# Altium PCB MicroMMC_SM_v3.PcbDoc
Units mm, origin at the board's own origin, x right, y up, seen from the top; angles counter-clockwise.
Board outline 50 x 25 mm, 4 copper layers (Top Layer, GND1, GND2, Bottom Layer), stack 1.586 mm thick; 71 components, 41 nets, 213 pads, 184 vias.
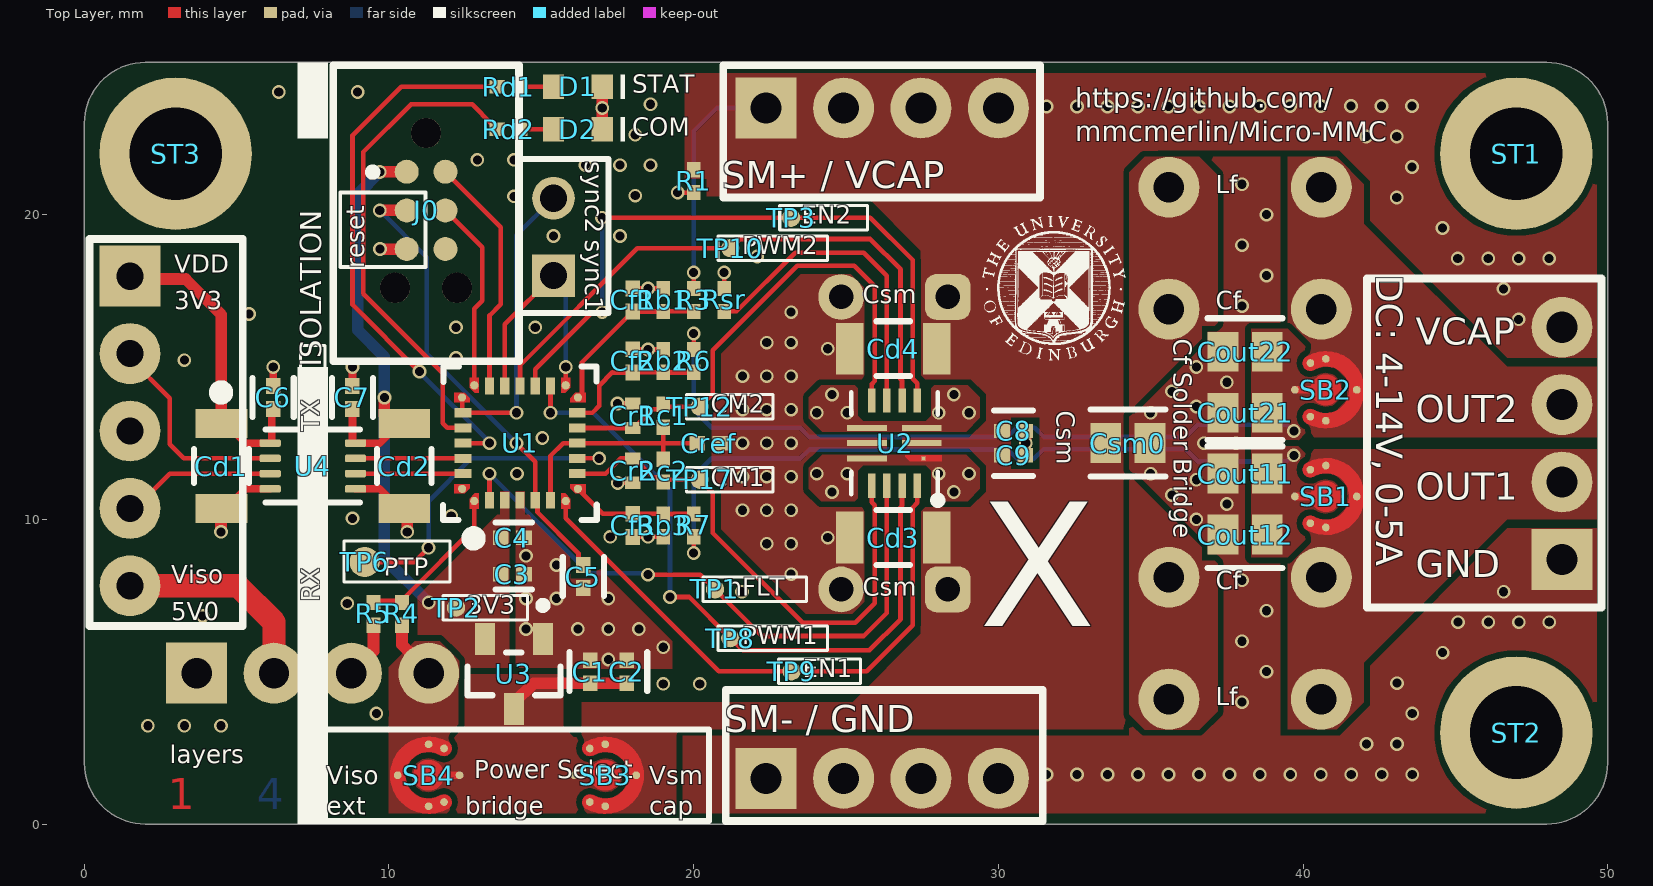
[diagram p0: Top Layer view]
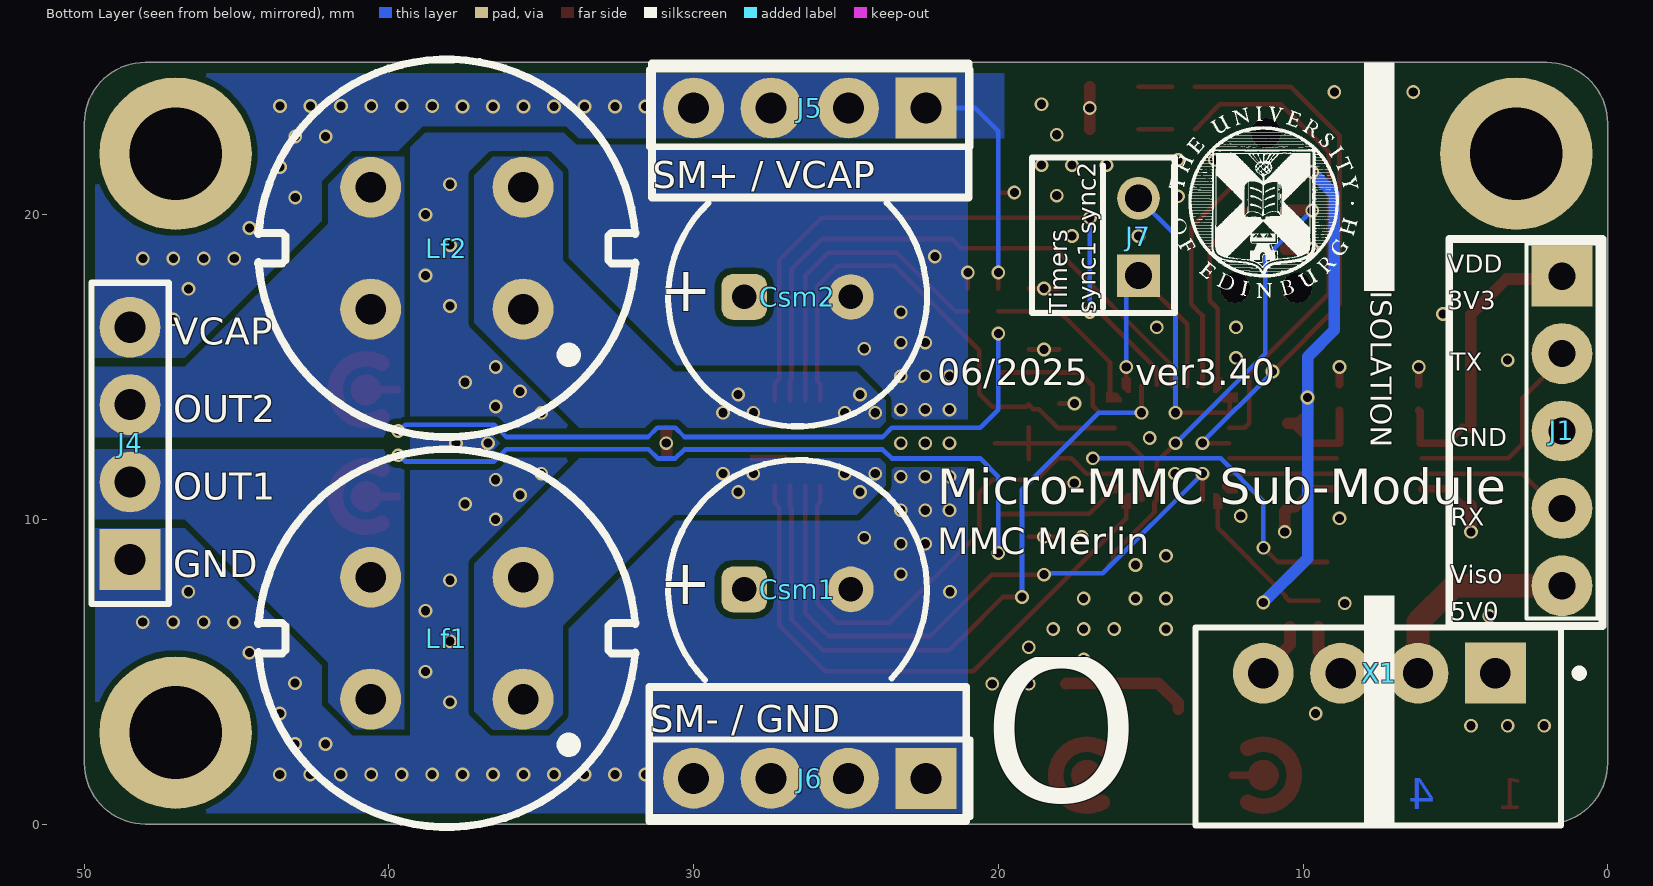
[diagram p1: Bottom Layer view, seen from below]
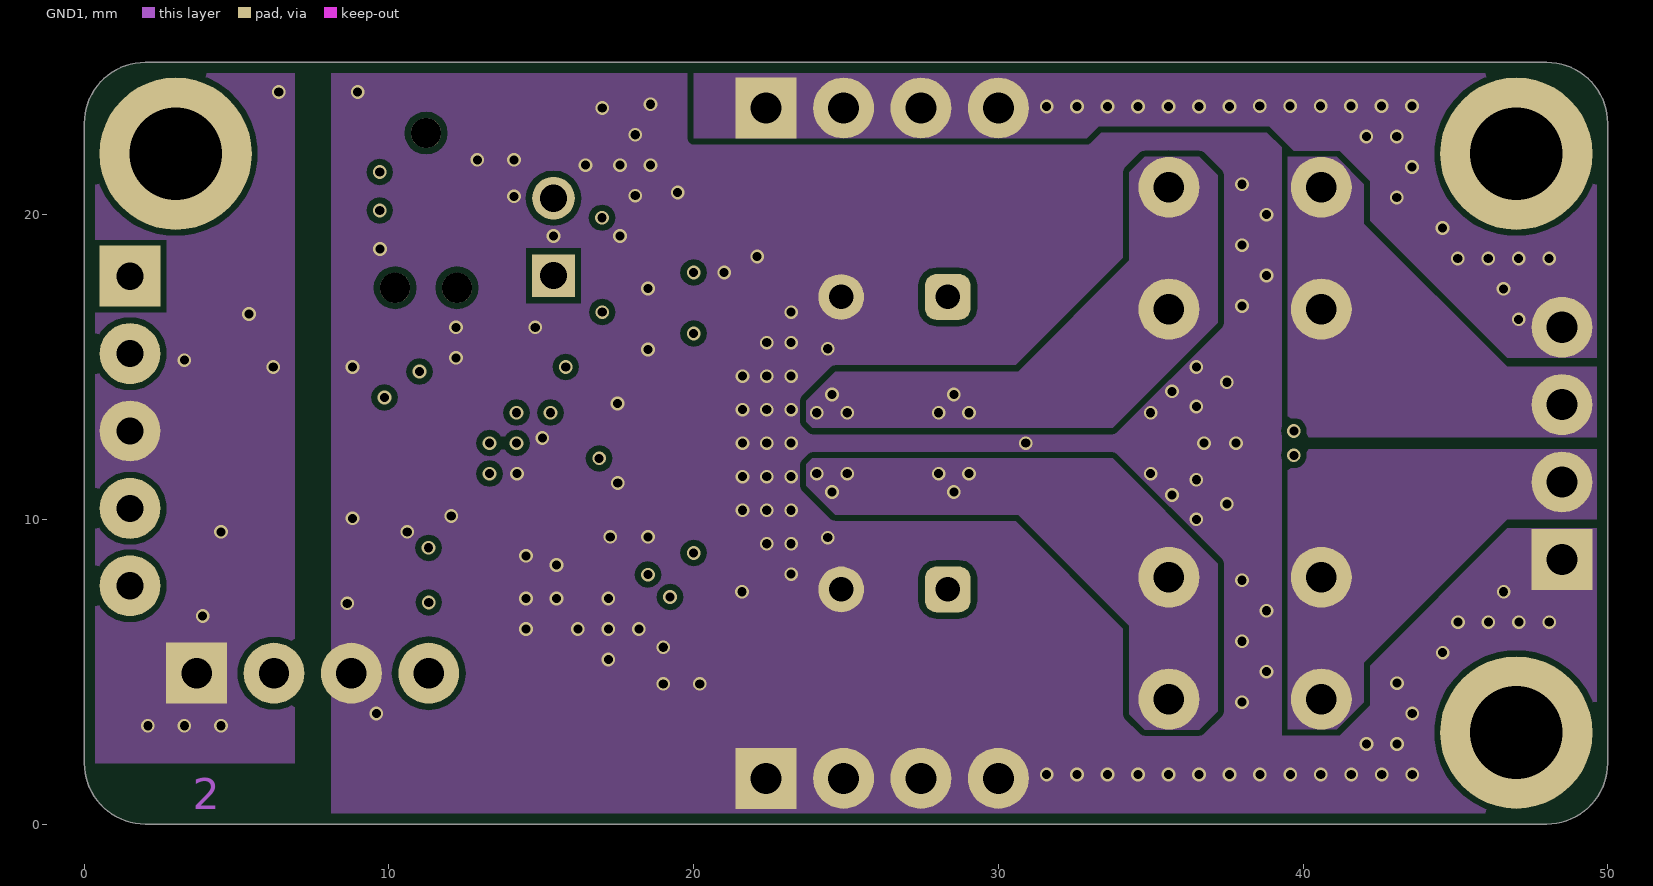
[diagram p2: GND1]
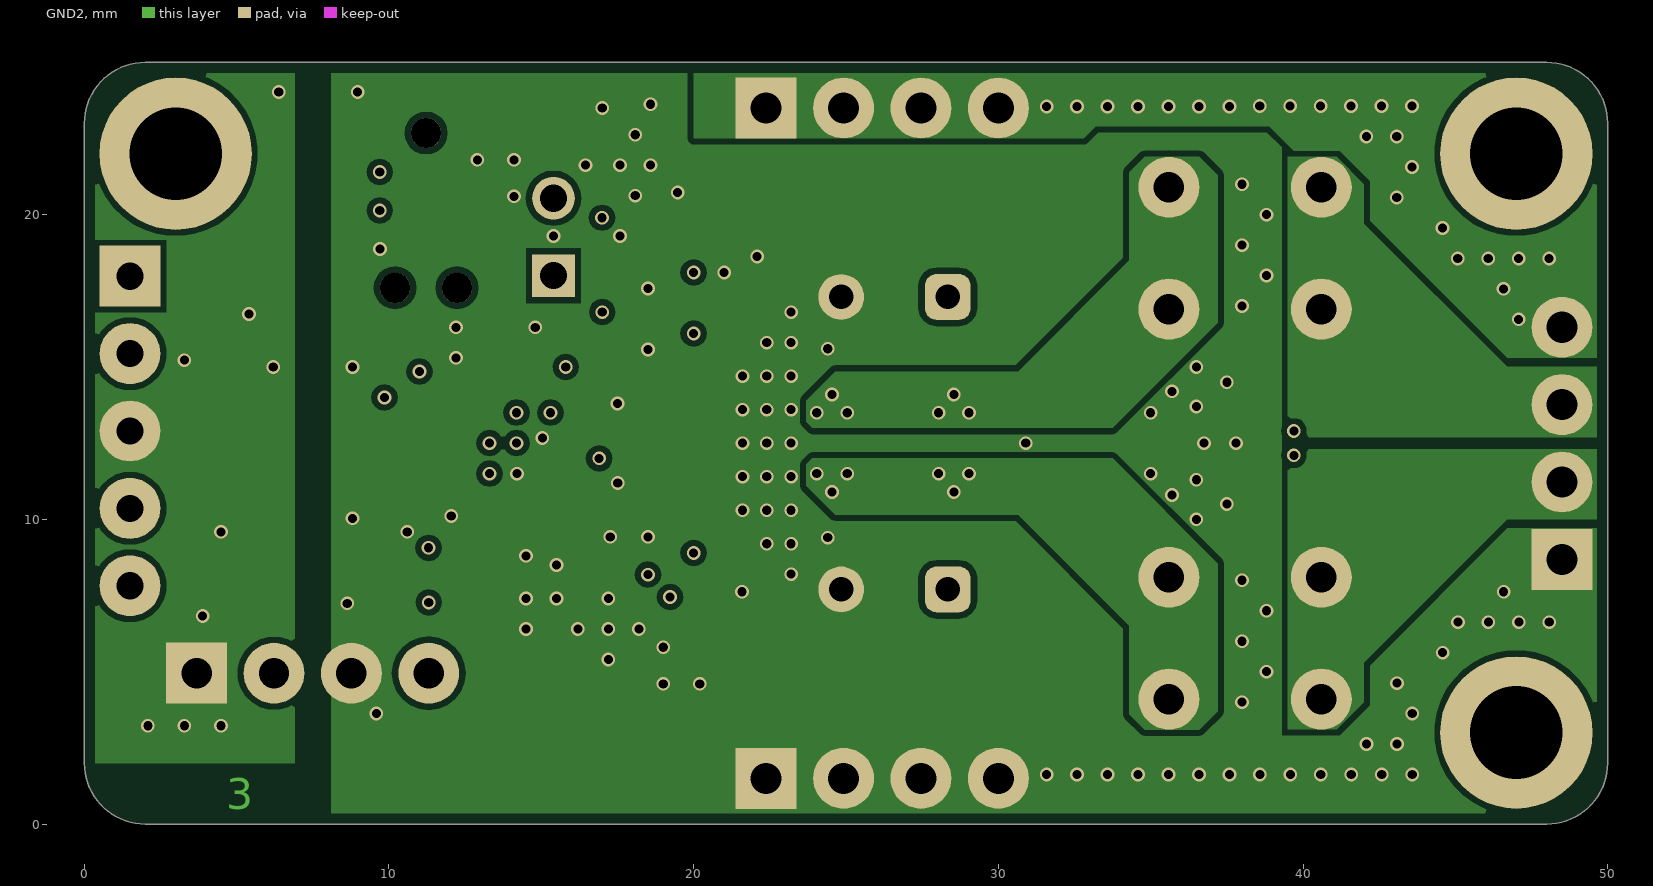
[diagram p3: GND2]
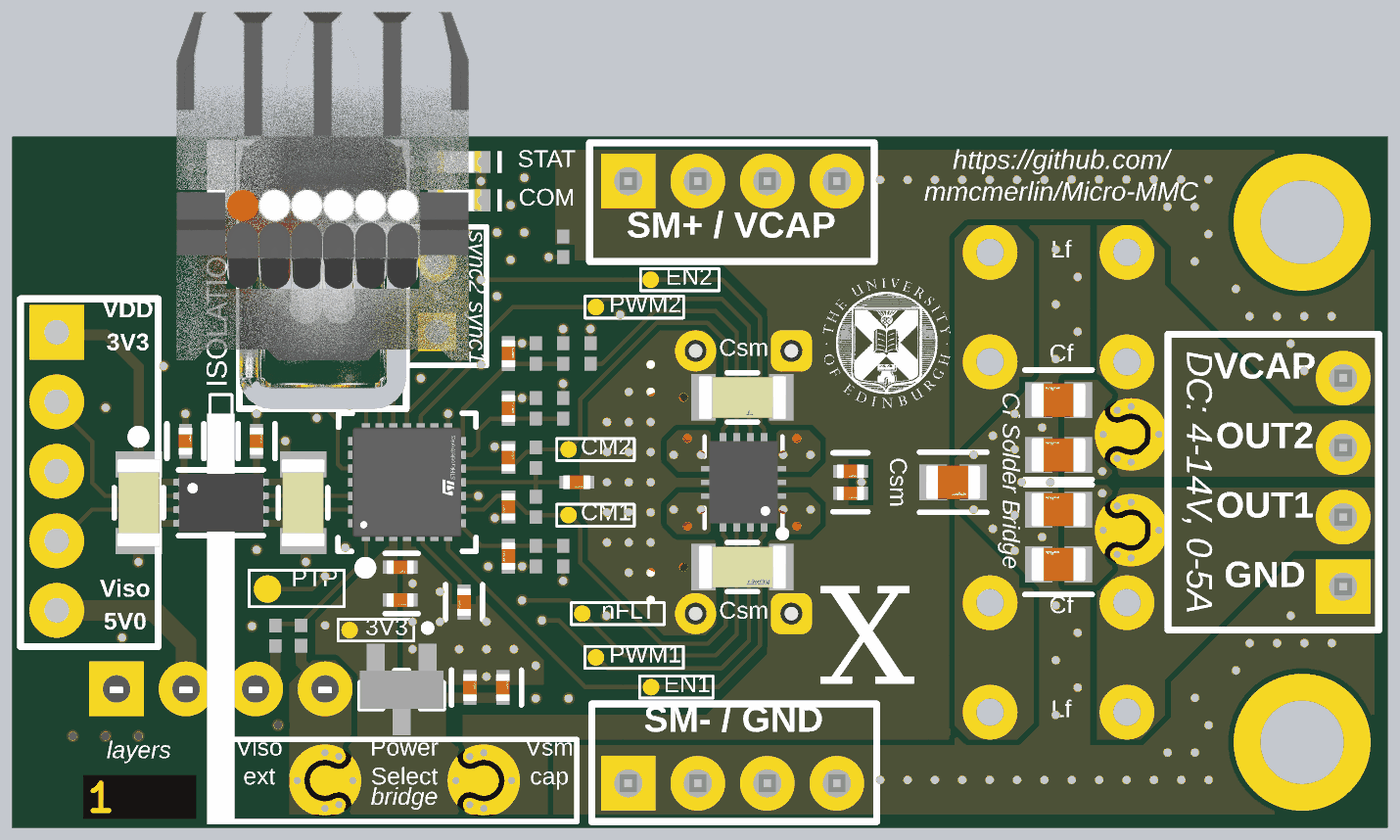
[diagram p4: 3D render of the assembled board from above, using the file's embedded part models]
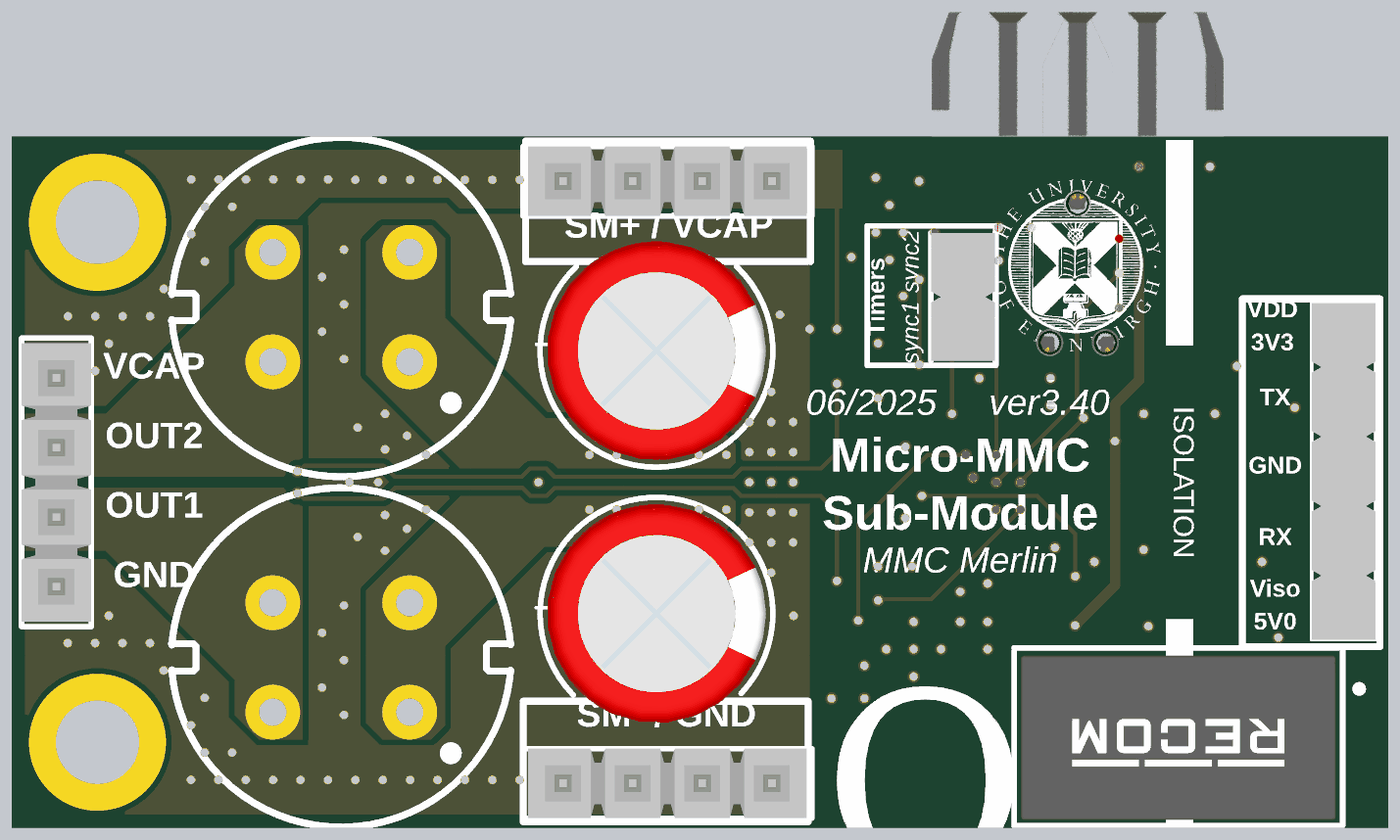
[diagram p5: 3D render of the assembled board from below, using the file's embedded part models]

## Layer stack, top to bottom
Top Solder: solder mask 0.0127, Solder Resist, Dk 3.8
Top Layer: signal copper 0.035
Dielectric 1: prepreg 0.2104, PP-022, Dk 4.6
GND1: signal copper 0.0152
Dielectric1: core 1.065, FR-4, Dk 4.6
GND2: signal copper 0.0152
Dielectric 2: prepreg 0.2104, PP-022, Dk 4.6
Bottom Layer: signal copper 0.035
Bottom Solder: solder mask 0.0127, Solder Resist, Dk 3.8

## Board outline
0,2 0,23 cw(c2,23) 2,25 48,25 cw(c48,23) 50,23 50,2 cw(c48,2) 48,0 2,0 cw(c2,2)

## Design rules (kind name [scope] priority, off if disabled: settings)
BoardOutlineClearance [All] p1: gap=0.35 ignorepadtopadclearanceinfootprint=FALSE
Clearance [All] p1: gap=0.2 ignorepadtopadclearanceinfootprint=FALSE except(0.254: Via-Via)
Height [All] p1: minheight=0 maxheight=100 prefheight=12.7
HoleSize [All] p1: absolutevalues=TRUE maxlimit=6 minlimit=0.25 maxpercent=80.000 minpercent=20.000
HoleToHoleClearance [All] p1: gap=0.45 allowstackedmicrovias=TRUE
MinimumSolderMaskSliver [All] p1: minsoldermaskwidth=0.1
PlaneConnect [All] p1: planeconnectstyle=Direct reliefexpansion=0.508 reliefentries=4 reliefconductorwidth=0.254 reliefairgap=0.254
PolygonConnect [All] p1: connectstyle=Direct reliefconductorwidth=0.254 reliefentries=4 polygonreliefangle="90 Angle" airgapwidth=0.254
RoutingVias [All] p1: holewidth=1 width=2 viastyle="Through Hole" minholewidth=0.3 minwidth=0.45 maxholewidth=6 maxwidth=12
SilkToSolderMaskClearance [IsPad] p1: minsilkscreentomaskgap=0.15 clearancetoexposedcopper=TRUE
SolderMaskExpansion [Not IsVia] p1: expansion=0.04 istentingtop=FALSE
SolderMaskExpansion SolderMaskExpansion_via [IsVia] p2: expansion=0.102 istentingtop=TRUE
SupplyNets "Schematic Supply Nets_5" [InNet('GND_SM')] p1: voltage=0.000
SupplyNets "Schematic Supply Nets_7" [InNet('Viso_SM')] p2: voltage=0.000
SupplyNets "Schematic Supply Nets_6" [InNet('+3.3V_SM')] p3: voltage=0.000
SupplyNets "Schematic Supply Nets_4" [InNet('Vdd_MA')] p4: voltage=0.000
SupplyNets "Schematic Supply Nets_3" [InNet('GND_MA')] p5: voltage=0.000
SupplyNets "Schematic Supply Nets_2" [InNet('V_REF')] p6: voltage=0.000
SupplyNets "Schematic Supply Nets_1" [InNet('Viso_MA')] p7: voltage=0.000
SupplyNets "Schematic Supply Nets" [InNet('VCAP_SM')] p8: voltage=0.000
UnRoutedNet [All] p1: checkbadconnections=TRUE
Width [All] p1: maxlimit=0.762 minlimit=0.152 preferedwidth=0.381
23 further rules are at their usual default settings.

## Components (designator, comment, footprint, x,y, rotation, side; value= is the part's Value field where it differs from the comment)
C1 "GRM155R61E105KA12D" FP-GRM155-0_05-IPC_C 16.6,5 r90 top
C2 "GRM155R61E105KA12D" FP-GRM155-0_05-IPC_C 17.8,5 r90 top
C3 "GRM155R61E105KA12D" FP-GRM155-0_05-IPC_C 14.05,8.2 r0 top
C4 "GRM155R61E105KA12D" FP-GRM155-0_05-IPC_C 14.05,9.4 r0 top
C5 "GRM155R61E105KA12D" FP-GRM155-0_05-IPC_C 16.379,8.121 r270 top
C6 "GRM155R61E105KA12D" FP-GRM155-0_05-IPC_C 6.2,14 r90 top
C7 "GRM155R61E105KA12D" FP-GRM155-0_05-IPC_C 8.8,14 r90 top
C8 "GRM155R61E105KA12D" FP-GRM155-0_05-IPC_C 30.5,12.9 r0 top
C9 "GRM155R61E105KA12D" FP-GRM155-0_05-IPC_C 30.5,12.1 r0 top
Cd1 "C1206C104M5RACTU" FP-C1206C-EB-MFG#1 4.5,11.75 r270 top value="0.10 μF"
Cd2 "C1206C104M5RACTU" FP-C1206C-EB-MFG#1 10.5,11.75 r270 top value="0.10 μF"
Cd3 "C1206C104M5RACTU" FP-C1206C-EB-MFG#2 26.55,9.4 r180 top value="0.10 μF"
Cd4 "C1206C104M5RACTU" FP-C1206C-EB-MFG#2 26.55,15.6 r180 top value="0.10 μF"
Cf1 "CL05B103KB5NNNC" FP-CL165-IPC_C 18,17.2 r90 top
Cf2 "CL05B103KB5NNNC" FP-CL165-IPC_C 18,15.2 r90 top
Cf3 "CL05B103KB5NNNC" FP-CL165-IPC_C 18,9.8 r270 top
Cout11 "GRM21BR61H475ME51L" FP-GRM21B-0_15-IPC_C 38.1,11.5 r180 top
Cout12 "GRM21BR61H475ME51L" FP-GRM21B-0_15-IPC_C 38.1,9.5 r180 top
Cout21 "GRM21BR61H475ME51L" FP-GRM21B-0_15-IPC_C 38.1,13.5 r180 top
Cout22 "GRM21BR61H475ME51L" FP-GRM21B-0_15-IPC_C 38.1,15.5 r180 top
Cr1 "GJM1555C1H100JB01D" FP-GJM155-0_05-MFG 18,13.4 r90 top
Cr2 "GJM1555C1H100JB01D" FP-GJM155-0_05-MFG 18,11.6 r270 top
Cref "GRM155R61E105KA12D" FP-GRM155-0_05-IPC_C 20.5,12.5 r0 top
Csm0 "GRM21BR61H475ME51L" FP-GRM21B-0_15-IPC_C 34.25,12.5 r0 top
Csm1 "860010474012" WCAP-ATG8_D8H11.5 26.59,7.7 r0 bottom value=470uF
Csm2 "860010474012" WCAP-ATG8_D8H11.5 26.59,17.3 r0 bottom value=470uF
D1 "150060RS75000" WL-SMCW_0603_150060xx75000 16.2,24.2 r180 top
D2 "150060RS75000" WL-SMCW_0603_150060xx75000 16.2,22.8 r180 top
J0 "TC2030-CTX-NL" FP-TC2030-CTX-NL-MFG 11.216,20.14 r270 top
J1 "5-146280-5" 5-146280-5 1.5,17.98 r270 bottom
J4 "TSW-104-08-L-S" SMTC-TSW-104-08-X-S 48.5,8.685 r90 bottom
J5 "TSW-104-08-L-S" SMTC-TSW-104-08-X-S 22.38,23.5 r0 bottom
J6 "TSW-104-08-L-S" SMTC-TSW-104-08-X-S 22.38,1.5 r0 bottom
J7 "5-146280-2" TECO-5-146280-2_V 15.4,19.27 r90 bottom
Lf1 "RCH1216BNP-100M" "TH Inductor" 35.6,8.1 r270 bottom
Lf2 "RCH1216BNP-100M" "TH Inductor" 35.6,20.9 r270 bottom
R1 "RC0402FR-0710KL" RESC1005X40X25LL05T10 20,21.1 r90 top
R3 "RC0402FR-0710KL" RESC1005X40X25LL05T10 20,17.2 r90 top
R4 "RC0402FR-0710KL" RESC1005X40X25LL05T10 10.426,6.897 r270 top
R5 "RC0402FR-0710KL" RESC1005X40X25LL05T10 9.491,6.896 r90 top
R6 "RC0402FR-0710KL" RESC1005X40X25LL05T10 20,15.2 r90 top
R7 "RC0402FR-0710KL" RESC1005X40X25LL05T10 20,9.8 r270 top
Rb1 "RC0402FR-073K3L" RESC1005X40X25LL05T10 19,17.2 r270 top
Rb2 "RC0402FR-073K3L" RESC1005X40X25LL05T10 19,15.2 r270 top
Rb3 "RC0402FR-073K3L" RESC1005X40X25LL05T10 19,9.8 r90 top
Rc1 "RC0402FR-073K3L" RESC1005X40X25LL05T10 19,13.4 r270 top
Rc2 "RC0402FR-073K3L" RESC1005X40X25LL05T10 19,11.6 r90 top
Rd1 "RC0402FR-073K3L" RESC1005X40X25LL05T10 13.925,24.2 r0 top
Rd2 "RC0402FR-073K3L" RESC1005X40X25LL05T10 13.925,22.8 r0 top
Rsr "RC0402FR-0710KL" RESC1005X40X25LL05T10 21,17.2 r270 top
SB1 "Solder-Bridge-NO" Solder-Bridge-NO-Footprint-1#1 40.75,10.75 r180 top
SB2 "Solder-Bridge-NO" Solder-Bridge-NO-Footprint-1#1 40.75,14.25 r180 top
SB3 "Solder-Bridge-NO" Solder-Bridge-NO-Footprint-1#2 17.1,1.6 r180 top
SB4 "Solder-Bridge-NO" Solder-Bridge-NO-Footprint-1#1 11.3,1.6 r0 top
ST1 "PTH-M3D0X5" PTH-M2D5X5#1 47,24.5 r0 top locked
ST2 "PTH-M3D0X5" PTH-M2D5X5#2 47,0.5 r0 top locked
ST3 "PTH-M3D0X5" PTH-M2D5X5#3 -7,24.5 r0 top locked
TP1 "TPAD6R" TP06R#1 20.7,7.7 r90 top
TP2 "TPAD6R" TP06R#1 12.2,7.1 r270 top
TP3 "TPAD6R" TP06R#1 23.2,19.9 r90 top
TP6 "TPAD6R" TP06R#2 9.2,8.6 r90 top locked
TP8 "TPAD6R" TP06R#1 21.2,6.1 r90 top
TP9 "TPAD6R" TP06R#1 23.214,5.014 r90 top
TP10 "TPAD6R" TP06R#1 21.2,18.9 r90 top
TP12 "TPAD6R" TP06R#1 20.2,13.7 r0 top
TP17 "TPAD6R" TP06R#1 20.2,11.3 r0 top
U1 "STM32G071GBU6" FP-UFQFPN28-A0B0-MFG 14.3,12.5 r90 top
U2 "MP6551GQB-P" QFN-14_MP6551_MNP 26.59,12.5 r180 top
U3 "MCP1799T-3302H/TT" FP-C04-104-MFG 14.1,4.925 r270 top
U4 "ISO6521REUR" SON50P300X105-8N 7.5,11.75 r0 top
X1 "RFM-0505S" FP-RFM-0505S-MFG 7.535,3.2 r0 bottom

## Footprints (in the part's own frame and the unit in brackets; to place one, negate y for a bottom-side part, rotate by r counter-clockwise, add the part's x,y. Pads: shape width x height; smd on the part's side, far side on the other; paste and mask are expansions set on the pad)
5-146280-5 [mm] "PCB Mount Header, Vertical, Board-to-Board, 5 Position, 2.54 mm [.1 in] Centerline, Breakaway, Gold (Au), Through Hole - Solder, AMPMODU Headers"
  rect 2x2 hole 0.89: 1(0,0)
  round 2 hole 0.89: 2(2.54,0) 3(5.08,0) 4(7.62,0) 5(10.16,0)
  silkscreen extent -1.07,-1.17 11.23,1.17, body extent -1.07,-1.17 11.23,1.17, height 8.19
FP-C04-104-MFG [mm]
  rect 1.05x0.65 smd paste+0 mask+0: 1(-1.15,0.95) 2(-1.15,-0.95) 3(1.15,0)
  silkscreen extent -2.37,-1.53 0.7,1.52, body extent -1.78,-1.88 1.78,1.87, height 0.25
FP-C1206C-EB-MFG#1 [mm]
  rect 0.95x1.7 smd paste+0 mask+0: 1(-1.4,0) 2(1.4,0)
  silkscreen extent -0.55,-0.9 0.55,0.9, body extent -2,-1 2,1, height 0.25
FP-C1206C-EB-MFG#2 [mm]
  rect 0.9x1.7 smd paste+0 mask+0: 1(-1.425,0) 2(1.425,0)
  silkscreen extent -0.55,-0.9 0.55,0.9, body extent -2,-1 2,1, height 0.25
FP-CL165-IPC_C [mm]
  rect 0.515x0.472 smd paste+0 mask+0: 1(-0.379,0) 2(0.379,0)
  body extent -0.74,-0.38 0.74,0.38, height 0.25
FP-GJM155-0_05-MFG [mm]
  rect 0.4x0.5 smd paste+0 mask+0: 1(-0.4,0) 2(0.4,0)
  body extent -0.7,-0.38 0.7,0.38, height 0.25
FP-GRM21B-0_15-IPC_C [mm]
  rect 1.006x1.308 smd paste+0 mask+0: 1(-0.726,0) 2(0.726,0)
  silkscreen extent -1.23,-1.1 1.23,-1.1, body extent -1.33,-0.8 1.33,0.8, height 0.25
FP-GRM155-0_05-IPC_C [mm]
  rect 0.515x0.472 smd paste+0 mask+0: 1(-0.379,0) 2(0.379,0)
  silkscreen extent -0.64,0.67 0.64,0.67, body extent -0.74,-0.38 0.74,0.38, height 0.25
FP-RFM-0505S-MFG [mm]
  rect 2x2 hole 1 paste-2539.97 mask+0: 1(-3.85,-1.75)
  round 2 hole 1 paste-2539.97 mask+0: 2(-1.31,-1.75) 3(1.23,-1.75) 4(3.77,-1.75)
  silkscreen extent -6.72,-3.25 6,3.25, body extent -5.75,-2.97 5.75,3.04, height 10.5
FP-TC2030-CTX-NL-MFG [mil]
  round 30.98 smd paste-39370.1 mask+0: 1(-50,-25) 2(-50,25) 3(0,-25) 4(0,25) 5(50,-25) 6(50,25)
  round 39.02 hole 39.02 unplated paste-99999 mask+0: ""(-100,0) ""(100,40) ""(100,-40)
  silkscreen extent -54,-74 -45,-64, body extent -199,-124 199,124, height 10
FP-UFQFPN28-A0B0-MFG [mm]
  round 0.27 smd paste+0 mask+0: 1(-1.9,1.5) 7(-1.9,-1.5) 8(-1.5,-1.9) 14(1.5,-1.9) 15(1.9,-1.5) 21(1.9,1.5) 22(1.5,1.9) 28(-1.5,1.9)
  rect 0.55x0.3 smd paste+0 mask+0: 2(-1.875,1) 3(-1.875,0.5) 4(-1.875,0) 5(-1.875,-0.5) 6(-1.875,-1) 16(1.875,-1) 17(1.875,-0.5) 18(1.875,0) 19(1.875,0.5) 20(1.875,1)
  rect 0.3x0.55 smd paste+0 mask+0: 9(-1,-1.875) 10(-0.5,-1.875) 11(0,-1.875) 12(0.5,-1.875) 13(1,-1.875) 23(1,1.875) 24(0.5,1.875) 25(0,1.875) 26(-0.5,1.875) 27(-1,1.875)
  Top Layer region: 1.65,1.35 1.65,1.48 1.82,1.65 2.15,1.65 2.15,1.35 1.65,1.35
  Top Layer region: -1.35,-1.65 -1.48,-1.65 -1.65,-1.82 -1.65,-2.15 -1.35,-2.15 -1.35,-1.65
  Top Layer region: -1.65,-1.35 -1.65,-1.48 -1.82,-1.65 -2.15,-1.65 -2.15,-1.35 -1.65,-1.35
  Top Layer region: 1.65,-1.35 1.65,-1.48 1.82,-1.65 2.15,-1.65 2.15,-1.35 1.65,-1.35
  Top Layer region: -1.65,1.35 -1.65,1.48 -1.82,1.65 -2.15,1.65 -2.15,1.35 -1.65,1.35
  Top Layer region: 1.35,-1.65 1.48,-1.65 1.65,-1.82 1.65,-2.15 1.35,-2.15 1.35,-1.65
  Top Layer region: 1.35,1.65 1.48,1.65 1.65,1.82 1.65,2.15 1.35,2.15 1.35,1.65
  Top Layer region: -1.35,1.65 -1.48,1.65 -1.65,1.82 -1.65,2.15 -1.35,2.15 -1.35,1.65
  silkscreen extent -3.32,-2.52 2.52,2.52, body extent -2.25,-2.25 2.25,2.25, height 0.25
PTH-M2D5X5#1 [mm]
  round 5 hole 3.05: 1(0,-2.5)
PTH-M2D5X5#2 [mm]
  round 5 hole 3.05: 1(0,2.5)
PTH-M2D5X5#3 [mm]
  round 5 hole 3.05: 1(10,-2.5)
QFN-14_MP6551_MNP [mm]
  rect 0.127x0.127 smd mask+0: 1(-0.95,0.5)
  rect 1.3x0.2 smd paste+0 mask+0: 2(-0.9,0) 3(-0.9,-0.5) 8(0.9,-0.5) 9(0.9,0) 10(0.9,0.5)
  rect 0.25x0.8 smd paste+0 mask+0: 4(-0.75,-1.4) 5(-0.25,-1.4) 6(0.25,-1.4) 7(0.75,-1.4) 11(0.75,1.4) 12(0.25,1.4) 13(-0.25,1.4) 14(-0.75,1.4)
  Top Layer region: -0.5,0.6 -1.55,0.6 -1.55,0.4 -0.35,0.4 -0.35,0.45
  silkscreen extent -1.42,-1.68 1.42,1.68, body extent -1.25,-1.5 1.25,1.5, height 0.87
RESC1005X40X25LL05T10 [mm] "Chip Resistor, 2-Leads, Body 1.00x0.50mm, IPC High Density"
  rect 0.5x0.45 smd: 1(-0.375,0) 2(0.375,0)
  body extent -0.53,-0.27 0.53,0.28, height 0.4
SMTC-TSW-104-08-X-S [mm] ".025 SQ Post Terminal Strip Assembly, 1x4 Pins, Vertical, 2.54mm Pitch, Male"
  rect 2x2 hole 1.02: 1(0,0)
  round 2 hole 1.02: 2(2.54,0) 3(5.08,0) 4(7.62,0)
  silkscreen extent -1.46,-1.27 9.08,1.27, body extent -1.27,-1.27 8.89,1.27, height 8.38
Solder-Bridge-NO-Footprint-1#1 [mil]
  round 10 smd mask+4: 1(-40,0) 1(0,40) 1(0,-40) 1(20,34.64) 1(20,-34.64)
  round 10 smd mask+0: 2(40,0)
  Top Layer circle w20: c0,0 r10
  Top Layer lines w10: 40,0 0,0
  Top Layer lines w20: 20,34.64 ccw(c0,0) 20,-34.64
Solder-Bridge-NO-Footprint-1#2 [mil]
  round 10 smd mask+4: 1(-40,0) 1(0,40) 1(0,-40) 1(20,34.64) 1(20,-34.64)
  round 10 smd mask+0: 2(40,0)
  Top Layer circle w20: c0,0 r10
  Top Layer lines w20: 20,34.64 ccw(c0,0) 20,-34.64
SON50P300X105-8N [mm] "SON, 8-Leads, Body 2.00x3.00mm, Pitch 0.50mm, IPC Medium Density"
  rrect50% 0.7x0.25 smd mask+0: 1(-1.4,0.75) 2(-1.4,0.25) 3(-1.4,-0.25) 4(-1.4,-0.75) 5(1.4,-0.75) 6(1.4,-0.25) 7(1.4,0.25) 8(1.4,0.75)
  silkscreen extent -3.21,-1.2 1.55,2.61, body extent -1.56,-1.05 1.56,1.05, height 1.05
TECO-5-146280-2_V [mm] "Connector, 2-Leads, Body 4.67x2.34mm, Pitch 2.54mm"
  rect 1.4x1.4 hole 0.89: 1(-1.27,0)
  round 1.4 hole 0.89: 2(1.27,0)
  silkscreen extent -2.33,-1.17 2.33,1.17, body extent -2.34,-1.17 2.34,1.17, height 5.33
"TH Inductor" [mm]
  round 2 hole 1: 1(4,0) 2(4,-5) 3(0,-5) 4(0,0)
  silkscreen extent -4.2,-8.7 8.2,3.7, body extent -4.27,-8.71 8.23,3.79, height 16.1
TP06R#1 [mm] "Testpoint, round, d=0.6mm"
  round 0.6 smd paste-1: 1(0,0)
TP06R#2 [mm] "Testpoint, round, d=0.6mm"
  round 1 smd paste-1: 1(0,0)
WCAP-ATG8_D8H11.5 [mm] "Aluminum Electrolytic Capacitors, 8x11.5mm"
  rrect50% 1.5x1.5 hole 0.8: 1(1.75,0)
  round 1.5 hole 0.8: 2(-1.75,0)
  silkscreen extent -4.25,-4.25 4.25,2.97, body extent -3.99,-4 3.99,3.99, height 11.81
WL-SMCW_0603_150060xx75000 [mm] "SMD Mono-color Chip LED, body 1.60 x 0.80 mm"
  rect 0.7x0.8 smd: 1(-0.8,0) 2(0.8,0)
  silkscreen extent -1.55,-0.4 -1.4,0.4, body extent -0.8,-0.4 0.8,0.4, height 0.7

## Part data
C1 C2 C3 C4 C5 C6 C7 C8 C9 Cref: library part CMP-2008-04581-2, "Chip Multilayer Ceramic Capacitors for General Purpose, 0402, 1.0uF, X5R, 15%, 10%, 25V", Capacitance=1uF, Case Code (Imperial)=0402, Case Code (Metric)=1005, Dielectric=X5R, JLCPCB Part #=C52923, Max Operating Temperature=85°C, Min Operating Temperature=-55°C, Package Quantity=10000, Tolerance=10%, Voltage=25V, Case/Package=0402, Depth=0.5mm, Height=0.5mm, Lead Free="Lead Free", Length=1mm, Material=Ceramic, Mount="Surface Mount", Packaging="Tape and Reel", REACH SVHC="No SVHC", Termination=SMD/SMT, Thickness=0.022inch, Voltage Rating=25V, Voltage Rating (DC)=25V, Weight=0.000212oz, Width=0.5mm
Cd1 Cd2 Cd3 Cd4: library part CMP-03020-028488-1, "CAP CER 0.1UF 50V X7R 1206", Capacitance="0.10 μF", JLCPCB Part #=C24497, Manufacturer=KEMET, Package=C1206C-EB, Temperature="-55°C to +150°C", Temperature Characteristic=X7R, Temperature Coefficient=15%, Temperature Range High=+150°C, Temperature Range Low=-55°C, Tolerance=0.2, Voltage Rating="50 V", Automotive=Yes, Automotive Grade="Grade 0", Category=Cap, ComponentLink2Description=Datasheet, ComponentLink2URL=https://content.kemet.com/datasheets/KEM_C1007_X8R_ULTRA_150C_SMD.pdf, Device Class L1="Passive Components", Device Class L2=Capacitors, Device Class L3="Ceramic Capacitors", Digikey Description="CAP CER 0.1UF 50V X7R 1206", Height=0.88mm, Ipc Land Pattern Name=CAPC320160X78, Lead Free=Yes, Manufacturer Part Number=C1206C104M5RACTU, Material=Ceramic, Mouser Description="Multilayer Ceramic Capacitors MLCC - SMD/SMT 50volts 0.1uF X7R 20%", Octopart=https://octopart.com/c1206c104m5ractu-kemet-129344, RoHS=TRUE
Cf1 Cf2 Cf3: library part CMP-13271-000387-1, "Cap Ceramic 10nF 50V X7R ±10% SMD 0402 +125°C Paper T/R", Capacitance=10nF, Case Code (Imperial)=0402, Case Code (Metric)=1005, Dielectric=X7R, JLCPCB Part #=C15195, Max Operating Temperature=125°C, Min Operating Temperature=-55°C, Package Quantity=1, Tolerance=10%, Voltage=50V, Case/Package=0402, Contact Plating=Tin, Depth=0.5mm, Height=0.5mm, Lead Free="Lead Free", Length=1mm, Material=Ceramic, Mount="Surface Mount", Packaging="Tape and Reel", Radiation Hardening=No, Thickness=0.022inch, Voltage Rating=50V, Voltage Rating (DC)=50V, Width=0.02inch
Cout11 Cout12 Cout21 Cout22 Csm0: library part CMP-06035-037765-1, "Chip Multilayer Ceramic Capacitors for General Purpose, 0805, 4.7uF, X5R, 15%, 20%, 50V", Capacitance=4.7uF, Case Code (Imperial)=0805, Case Code (Metric)=2012, Dielectric=X5R, JLCPCB Part #=C98192, Max Operating Temperature=85°C, Min Operating Temperature=-55°C, Package Quantity=3000, Resistor Type=Ceramic, Tolerance=20%, Voltage Rating=50V, Case/Package=0805, Depth=1.2mm, Height=1.25mm, Length=2mm, Mount="Surface Mount", Packaging="Tape and Reel", Termination=SMD/SMT, Thickness=0.055inch, Voltage Rating (DC)=50V, Weight=0.000335oz, Width=0.049inch
Cr1 Cr2: library part CMP-2008-03797-2, "Multi-Layer Ceramic Capacitor 10pF C0G  ±5% 0402 Paper T/R", Capacitance=10pF, Case Code (Imperial)=0402, Case Code (Metric)=1005, Dielectric=C0G, JLCPCB Part #=C32949, Max Operating Temperature=125°C, Min Operating Temperature=-55°C, Package Quantity=1, Tolerance=5%, Voltage=50V, Case/Package=0402, Depth=0.5mm, Height=0.5mm, Lead Free="Lead Free", Length=1mm, Mount="Surface Mount", Packaging="Tape and Reel", Radiation Hardening=No, Termination=SMD/SMT, Thickness=0.022inch, Voltage Rating=50V, Voltage Rating (DC)=50V, Width=0.02inch
Csm1 Csm2: library part CMP-03913-54007214-1, "860010474012 WCAP-ATG8 Aluminum Electrolytic Capacitors", Capacitance=330µF, Capacitor Type=Aluminium, Case/Package=Radial, Leakage Current=82.5µA, Manufacturer=Panasonic, Manufacturer Part Number=ECA-1CHG471, Max Operating Temperature=85°C, Min Operating Temperature=-40°C, Package Shape=Cylindrical, Package Style=RadialMeter, Rated DC Voltage (URdc)=16V, Ripple Current=451mA, Supplier Part Number 1=667-ECA-1CHG471, Tolerance=20%, Voltage Rating=25V, Category="Aluminum Electrolytic Capacitors", ComponentLink1Description=https://datasheet.ciiva.com:443/pdfs/VipMasterIC/IC/PANA/PANA-S-A0009903858/PANA-S-A0009903858-1.pdf?src-supplier=IHS+Markit, ComponentLink1URL=https://datasheet.ciiva.com:443/pdfs/VipMasterIC/IC/PANA/PANA-S-A0009903858/PANA-S-A0009903858-1.pdf?src-supplier=IHS+Markit, ComponentLink2Description=https://datasheet.ciiva.com/11777/0900766b800301b8-11777772.pdf?src-supplier=Rs, ComponentLink2URL=https://datasheet.ciiva.com/11777/0900766b800301b8-11777772.pdf?src-supplier=Rs, ComponentLink3Description=https://datasheet.ciiva.com/16397/aba0000ce26-16397142.pdf?src-supplier=Future+Electronics, ComponentLink3URL=https://datasheet.ciiva.com/16397/aba0000ce26-16397142.pdf?src-supplier=Future+Electronics, ComponentLink4Description=https://datasheet.ciiva.com/2984/aba0000ce26-2984287.pdf?src-supplier=Avnet, ComponentLink4URL=https://datasheet.ciiva.com/2984/aba0000ce26-2984287.pdf?src-supplier=Avnet, ComponentLink5Description=https://datasheet.ciiva.com/15197/getdatasheetpartid-255238-15197877.pdf?src-supplier=Verical, ComponentLink5URL=https://datasheet.ciiva.com/15197/getdatasheetpartid-255238-15197877.pdf?src-supplier=Verical, ComponentLink6Description=https://datasheet.ciiva.com/46386/1903322-46386215.pdf?src-supplier=Element14, ComponentLink6URL=https://datasheet.ciiva.com/46386/1903322-46386215.pdf?src-supplier=Element14, ComponentLink7Description=https://datasheet.ciiva.com/30106/8aba0000ce26-30106396.pdf?src-supplier=Onlinecomponents.com, ComponentLink7URL=https://datasheet.ciiva.com/30106/8aba0000ce26-30106396.pdf?src-supplier=Onlinecomponents.com, Diameter=8mm, Dielectric Material=Aluminium, Height=11.5mm, Height - Seated (Max)=13.0048mm, JESD-609 Code=e3, Lead Pitch=3.5052mm, Length=11.5mm, Life (Hours)=2000hours, Material=Aluminium, Mount="Through Hole", Mounting Technology="Through Hole", NexarPartId=54007214, Packaging="Tape & Box (TB)", Pins=2, Pitch=3.5mm, Polarity=Polar, Pricing 1="1=0.23, 10=0.168, 50=0.168, 100=0.132, 1000=0.127, 10000=0.114 (USD)", REACH SVHC=Unknown, Reach SVHC Compliant=Yes, RoHS=Compliant, RoHS Compliant=Yes, Stock 1=3498, Supplier 1=Mouser, Tan Delta=0.2, Terminal Finish=Tin, Terminal Pitch=3.5mm, Termination=Wire, Tolerance  (fill in as +-)=20%, Tolerance (fill in as +-)=20%, Voltage Rating (DC)=25V
D1 D2: library part CMP-1426-00001-4, "LED Low-Power Uni-Color Red 630nm 2V 2-Pin Chip 0603(1608Metric) T/R", Case Code (Imperial)=0603, Case Code (Metric)=1608, Color=Red, Forward Current=100mA, Forward Voltage=2V, JLCPCB Part #=C2286, Max Junction Temperature (Tj)=95°C, Max Operating Temperature=85°C, Max Reverse Voltage (DC)=5V, Min Operating Temperature=-40°C, Power Dissipation=72mW, Test Current=20mA, Case/Package=0603, Dominant Wavelength=625nm, Height=700µm, Length=1.6mm, Lens Style="Clear, Rectangular", Luminous Intensity=250mcd, Mount="Surface Mount", Packaging="Tape and Reel", Peak Wavelength=630nm, REACH SVHC=Unknown, Reverse Voltage=5V, RoHS=Compliant, Viewing Angle=140°, Wavelength=625nm, Width=800µm
J0: library part CMP-205963-000001-1, "6-Pin “No legs” TC2030 Plug-of-Nails™ Cable for use with ARM Cortex processors"
J1: library part CMP-002-00297-1, "Board Connector, 5 Contact(s), 1 Row(s), Male, Straight, Solder Terminal", Connector Type="BOARD CONNECTOR", Mounting Technology=Board, RoHS Compliant=Yes
J4 J5 J6: library part CMP-1024-00358-1, "0.025\" SQ Post Header, Through-hole, Vertical, -55 to 125 degC, 2.54 mm Pitch, 4-Pin, Male, RoHS", Flammability Rating="UL94 V-0", Manufacturer=Samtec, Manufacturer Part Number=G800W304018EU, Supplier Part Number 1=3882398, Temperature Range="-55 to 125 degC", Category=Connectors, ComponentLink1Description="Manufacturer URL", ComponentLink1URL=http://www.samtec.com, ComponentLink2Description=Datasheet, ComponentLink2URL=http://www.samtec.com/documents/webfiles/pdf/TSW_TH.PDF, ComponentLink3Description="Package Specification", ComponentLink3URL=http://www.samtec.com/documents/webfiles/cpdf/TSW-XXX-XX-XXX-X-XX-XXX-MKT.pdf, Connector Type="BOARD CONNECTOR", Contact Finish - Mating="GOLD OVER NICKEL (50)", Contact Finish - Termination="Tin (Sn) - with Nickel (Ni) barrier", Contact Gender=Male, Contact Material=Brass, DatasheetVersion=F-214, DIN Conformance=No, Filter Feature=No, IEC Conformance=No, JESD-609 Code=e3, MIL Conformance=No, Mixed Contacts=No, Mounting Style=STRAIGHT, Mounting Technology=Through-hole, Number of Contacts=4, Number of Rows Loaded=1, Option="General Purpose", Orientation=Vertical, PackageDescription=".025[0.64] SQ. Post Terminal Strip Assembly", PackageReference=TSW-104-08-X-S, PackageVersion="DM, 8/1988", PartNumber=TSW-104-08-L-S, Pitch="2.54 mm", Pricing 1="100=0.039, 1000=0.034, 2500=0.033, 5000=0.032, 10000=0.03, 20000=0.028 (GBP)", RoHS=True, RoHS Compliant=Yes, Stock 1=3007, Supplier 1=Farnell, Terminal Pitch=2.54mm, Termination=Solder
J7: library part CMP-2000-07492-1, "Male Header, Pitch 2.54 mm, 1 x 2 Position, Height 8.21 mm, Tail Length 3.05 mm, -65 to 105 degC, RoHS, Bulk", Case\/Package=100, Colour=Black, Current Rating=3A, Flammability Rating=UL94V-0, High Temperature Housing=Yes, Manufacturer="TE Connectivity", Max Current Rating=5A, Max Operating Temperature=105degC, Min Operating Temperature=-65degC, Package Description="Male Header, Pitch 2.54 mm, 1 x 2 Position, Height 8.21 mm, Tail Length 3.05 mm", Package Quantity=500, Approvals=CSA, Board Standoff=No(Without), Connector Type=Header, Contact Gender=Male, Contact Material=CopperAlloy, Contact Mating Length=0.23inch, Contact Plating=Matte, Contact Protection=No(Without), Contact Shape=Square, Datasheet URL=http://www.te.com/commerce/DocumentDelivery/DDEController?Action=showdoc&DocId=Customer+Drawing%7F146280%7FH1%7Fpdf%7FEnglish%7FENG_CD_146280_H1.pdf%7F5-146280-2, Datasheet Version="Rev. H1, 08/2016", Depth=2.34mm, Gasket=No(Without), High Speed Serial Data Connector=No, Housing Colour=Black, Housing Material=Polymer, Keyed=No, Length=4.67mm, Manufacturer URL=http://www.te.com/, Mating Alignment=No(Without), Mating Connector Lock=No(Without), Mating Post Length=0.23inch, Mount=ThroughHole, Mounting Technology=ThroughHole, Number of Contacts=2, Number of Positions=2, Number Of Rows=1, Orientation=Straight, Package Reference=5-146280-2, Packaging=Carton, Panel Mount Retention=No(Without), PCB Mount Retention=Without, PCB Mounting Orientation=Vertical, PCB Thickness=0.063inch, Pitch=2.54mm, Radiation Hardening=No, RoHSCompliant=true, Row Spacing=2.54mm, Selectively Loaded=No(Without), Stabilizers=No(Without), Termination=ThroughHole, Termination Post Length=0.12inch
Lf1 Lf2: library part CMP-006-00026-4, "Ind Power Unshielded Wirewound 10uH 20% 1KHz Ferrite 5A Pin Box"
R1 R3 R4 R5 R6 R7 Rsr: library part CMP-2002-07353-1, JLCPCB Part #=C25744, Manufacturer="Yageo / Phycomp", Resistance=10kΩ, Part Number=RC0402FR-0710KL
Rb1 Rb2 Rb3 Rc1 Rc2 Rd1 Rd2: library part CMP-2002-07652-1, "3.3k", JLCPCB Part #=C25890, Manufacturer="Yageo / Phycomp", Resistance=3.3kΩ, Part Number=RC0402FR-073K3L
SB1 SB2 SB3 SB4: library part CMP-00030-00003-3, "Normally Open Solder Bridge 10mil gap"
ST1 ST2 ST3: library part CMP-00028-00004-1, "M3.0 PTH (3.0mm), 5mm pad", Pins=1
TP1 TP2 TP3 TP6 TP8 TP9 TP10 TP12 TP17: library part CMP-00028-00002-1, "0.6mm round", Pins=1
U1: library part CMP-12105-000098-1, "IC MCU 32BIT 128KB FLSH 28UFQFPN", Case/Package=UFQFPN, Frequency=64MHz, JLCPCB Part #=C529347, Max Operating Temperature=85°C, Min Operating Temperature=-40°C, Core Architecture=ARM, Interface=I2C, Memory Size=128KB, Memory Type=FLASH, Number of I/Os=26, Number of Pins=28, Oscillator Type=Internal, Packaging=Tray, Peripherals="Brown-out Detect/Reset", RoHS Compliant=Yes
U2: library part CMP-024-00000-3, "Brushed DC Motor Driver Dual Half-Bridge PWM 2.5V to 14V 5A 14-Pin QFN", JLCPCB Part #=C3681210
U3: library part CMP-06324-000112-1, "IC REG LINEAR 3.3V 80MA SOT23-3", JLCPCB Part #=C7424770
U4: library part CMP-015-00010-3, "Functional isolation dual-channel 1/1 digital isolator 8-VSON -40 to 125", JLCPCB Part #=C22428095
X1: library part CMP-29842-000017-1, "DC DC CONVERTER 5V 1W", Max Output Voltage=5V, Height=10mm, Length=11.5mm, Weight=1.4g, Width=6mm

## Via types
v1: diameter 0.45, hole 0.3, Top Layer to Bottom Layer, tented both sides, 184 vias

## Nets (pads, with @x,y where several pads share a name; then routed paths per layer and width w, separated by ;. In a path a pad name is that pad's centre, name@x,y a point inside that pad or via, vN(x,y) a via of type N, cw(c..) or ccw(c..) an arc to the next point about the centre after c; other vN are vias at no path point)
+3.3V_SM: C3.1 C4.1 C7.1 Cd2.1 J0.1 TP2.1 U1.3 U3.2 U4.8 | length 20.3
  Top Layer w0.254: C7.1@8.8,13.571 8.802,13.571 8.802,12.502 8.804,12.5 U4.8 9.697,12.5 Cd2.1@10.224,13.026
  Top Layer w0.381: v1(9.697,21.4) 9.702,21.405 10.576,21.405 J0.1 ; v1(9.85,14) 9.85,13.434 10.135,13.15 Cd2.1
  Bottom Layer w0.381: v1(9.697,21.4) 8.971,20.673 8.971,16.214 9.85,15.334 v1(9.85,14) 9.85,8.727 v1(11.305,7.272)
Cf1: Cout11.1 Cout12.1 R7.2 SB1.2 | length 23.6
  Top Layer w0.152: v1(20,8.897) R7.2
  Bottom Layer w0.152: v1@20,8.9 20,11.4 20.599,11.999 23.5,11.999 23.791,12.29 30.309,12.29 30.6,11.999 31.181,11.999 31.483,12.3 36.149,12.3 36.549,11.9 39.462,11.9 39.662,12.1 v1(39.7,12.1)
Cf2: Cout21.1 Cout22.1 R6.2 SB2.2 | length 23.6
  Top Layer w0.152: R6.2 v1(20,16.1)
  Bottom Layer w0.152: v1(20,16.1) 20,13.6 20.599,13.001 23.5,13.001 23.8,12.701 ; 23.8,12.7 30.3,12.7 ; 30.3,12.701 30.6,13.001 31.2,13.001 31.5,12.701 36.15,12.701 36.549,13.1 39.462,13.1 39.662,12.9 v1(39.7,12.9)
EN1: TP9.1 U1.7 U2.14 | length 19.3
  Top Layer w0.152: U1.7 15.8,10.033 20.818,5.014 TP9.1 25.679,5.014 27.189,6.524 27.189,10.389 27.34,10.54 U2.14
EN2: TP3.1 U1.17 U2.4 | length 22
  Top Layer w0.152: U1.17@14.801,14.416 14.801,14.922 16.671,16.793 16.993,16.793 v1(17,16.8) ; v1(16.993,19.9) 25.8,19.9 27.189,18.511 27.189,14.611 27.34,14.46 U2.4
  Bottom Layer w0.152: v1(17,16.8) v1@17,19.893
GND_MA: C6.2 Cd1.2 J1.3 U4.4 X1.1 | length 3.3
  Top Layer w0.254: Cd1.2@4.5,10.474 4.776,10.474 5.303,11 U4.4 ; C6.2@6.2,14.429 v1(6.2,15)
  Top Layer w0.381: v1(4.484,9.589) 4.484,10.458 Cd1.2@4.5,10.474
  other v1: 2.084,3.224 3.284,3.224 4.484,3.224 3.884,6.824 3.284,15.224 5.403,16.743 6.383,24.029
GND_SM: C1.2 C2.2 C3.2 C4.2 C5.2 C7.2 C8.2 C9.2 Cd2.2 Cd3.2 Cd4.2 Cf1.2 Cf2.2 Cf3.2 Cout11.2 Cout12.2 Cout21.2 Cout22.2 Cr1.2 Cr2.2 Cref.2 Csm0.2 Csm1.2 Csm2.2 D1.1 D2.1 J0.5 J4.1 J6.1 J6.2 J6.3 J6.4 R1.1 R5.1 Rb1.1 Rb2.1 Rb3.1 Rsr.1 U1.4 U2.9 U3.1 U4.5 X1.3 | length 13.6
  Top Layer w0.152: v1(17.5,13.8) Cr1.2 ; v1(17.508,11.192) 17.511,11.196 17.996,11.196 Cr2.2 ; Cf2.2 18.004,15.575 Rb2.1 ; Cf1.2 18.004,17.575 Rb1.1 ; Cf3.2@18.004,9.425 Rb3.1 ; v1(19.475,20.725) R1.1 ; Rsr.1 v1(21,18.1)
  Top Layer w0.254: C7.2@8.8,14.429 v1(8.8,15) ; U4.5 9.697,11 Cd2.2@10.224,10.474 ; Cd2.2@9.9,10.698 10.248,10.35 Cd2.2
  Top Layer w0.381: X1.3 9.491,5.676 R5.1@9.491,6.471 ; v1(9.702,18.87) J0.5 ; Cd2.2 10.6,10.25 v1(10.6,9.589) ; D2.1 v1(17,23.5) D1.1 ; C9.2 30.889,12.1 30.889,12.489 v1(30.9,12.5) ; C8.2 30.9,12.879 v1@30.9,12.542
  other v1: 31.584,1.624 32.584,1.624 33.584,1.624 34.585,1.624 35.585,1.624 36.585,1.624 37.585,1.624 38.585,1.624 39.585,1.624 40.585,1.624 41.585,1.624 42.585,1.624 43.585,1.624 42.085,2.624 43.085,2.624 9.584,3.624 43.585,3.624 38,4 19,4.6 20.2,4.6 43.085,4.624 38.8,5 17.2,5.4 44.585,5.624 19,5.8 38,6 14.5,6.4 16.2,6.4 17.2,6.4 18.2,6.4 45.085,6.624 46.085,6.624 47.085,6.624 48.085,6.624 38.8,7 8.631,7.241 14.5,7.4 15.5,7.4 17.2,7.4 21.584,7.624 46.585,7.624 38,8 23.2,8.2 15.5,8.5 14.5,8.8 22.4,9.2 23.2,9.2 24.4,9.4 17.262,9.425 18.502,9.425 36.5,10 8.804,10.033 12.042,10.109 21.6,10.3 22.4,10.3 23.2,10.3 37.5,10.5 35.7,10.8 36.5,11.3 21.6,11.4 22.4,11.4 23.2,11.4 14.2,11.499 35,11.5 21.6,12.5 22.4,12.5 23.2,12.5 36.75,12.5 37.8,12.5 15.032,12.671 35,13.5 21.6,13.6 22.4,13.6 23.2,13.6 36.5,13.7 35.7,14.2 37.5,14.5 21.6,14.7 22.4,14.7 23.2,14.7 36.5,15 12.2,15.3 18.5,15.575 24.4,15.6 22.4,15.8 23.2,15.8 12.2,16.3 14.801,16.3 23.2,16.8 38,17 18.5,17.575 38.8,18 22.084,18.624 38,19 15.4,19.3 17.584,19.3 38.8,20 14.1,20.6 18.084,20.624 38,21 16.45,21.624 17.584,21.624 18.584,21.624 12.9,21.8 14.1,21.8 18.084,22.624 18.584,23.624 8.971,24.029
HB_nFAULT: TP1.1 U1.2 U2.12 | length 20.6
  Top Layer w0.152: U1.2 v1(13.299,11.499) ; v1(18.499,8.185) 20.215,8.185 TP1.1 22.23,6.17 25.583,6.17 26.34,6.926 U2.12
  Bottom Layer w0.152: v1(13.299,11.499) 16.573,8.225 18.459,8.225 v1(18.499,8.185)
LED_COM: Rd2.1 U1.24 | length 16.1
  Top Layer w0.152: U1.24 11.918,13 11.768,13.15 11.768,14.791 9.156,17.402 9.156,22.056 10.724,23.624 12.726,23.624 13.376,22.974 13.376,22.949 13.525,22.8 Rd2.1
led_com_r: D2.2 Rd2.2 | length 1.1
  Top Layer w0.152: Rd2.2 D2.2
led_stat_r: D1.2 Rd1.2 | length 1.1
  Top Layer w0.152: Rd1.2 D1.2
LED_STATUS: Rd1.1 U1.25 | length 18.2
  Top Layer w0.152: v1(11,14.85) 8.804,17.046 8.804,22.607 10.397,24.2 Rd1.1 ; U1.25@12.426,12.501 v1(13.3,12.501)
  Bottom Layer w0.152: v1(11,14.85) 11,14.826 13.3,12.526 v1(13.3,12.501)
nRESET: C5.1 J0.3 U1.5 | length 15.3
  Top Layer w0.152: v1@14.183,12.5 14.8,11.883 U1.5 14.874,10.551 14.874,10.337 14.874,10.236 16.219,8.891 16.219,8.66 C5.1
  Top Layer w0.381: v1(9.697,20.14) J0.3
  Bottom Layer w0.152: v1(9.697,20.14) 11.242,18.595 11.242,15.442 v1(14.183,12.501)
OUT1_1: Lf1.1 Lf1.4 U2.1 U2.10
  other v1: 24.54,10.9 28.54,10.9 24.04,11.5 25.04,11.5 28.04,11.5 29.04,11.5
OUT1_2: J4.2 Lf1.2 Lf1.3 SB1.1
OUT2_1: Lf2.1 Lf2.4 U2.3 U2.8
  other v1: 24.04,13.5 25.04,13.5 28.04,13.5 29.04,13.5 24.54,14.1 28.54,14.1
OUT2_2: J4.3 Lf2.2 Lf2.3 SB2.1
ProgTP: TP6.1 U1.10 | length 10.7
  Top Layer w0.152: TP6.1 10.835,8.6 v1(11.3,9.065) ; U1.10@16.176,12.001 v1@16.898,12.001
  Bottom Layer w0.152: v1(11.3,9.065) 11.3,10.6 12.7,12 16.898,12 v1(16.899,12.001)
PWM1: TP8.1 U1.16 U2.13 | length 22.5
  Top Layer w0.152: v1(15.3,13.5) U1.16 ; v1(19.225,7.45) 19.85,7.45 TP8.1 21.207,6.107 21.613,5.7 25.769,5.7 26.79,6.721 26.79,10.395 26.84,10.445 U2.13
  Bottom Layer w0.152: v1(15.3,13.5) 16.7,13.5 19.225,10.975 v1(19.225,7.45)
PWM2: TP10.1 U1.18 U2.5 | length 19.6
  Top Layer w0.152: U1.18 14.3,15.05 18.15,18.9 TP10.1 ; TP10.1@21.213,18.9 21.513,19.2 25.8,19.2 26.79,18.21 26.79,14.605 26.84,14.555 U2.5
RX_MA: J1.2 U4.2 | length 7
  Top Layer w0.152: J1.2 1.5,15.28 2.8,13.98 2.8,12.469 3.269,12 U4.2
RX_SM: U1.27 U4.6 | length 3.5
  Top Layer w0.152: U4.6 U1.27
SR: Rsr.2 U2.6 | length 10.5
  Top Layer w0.152: Rsr.2 21.405,16.825 23.334,18.754 25.58,18.754 26.34,17.994 U2.6
SWCLK: J0.4 U1.21 | length 6.3
  Top Layer w0.152: J0.4 13.06,18.931 13.06,17.175 12.8,16.915 U1.21
SWDIO: J0.2 U1.20 | length 8
  Top Layer w0.152: J0.2 13.671,19.59 13.671,17.061 13.3,16.69 13.3,14.495 13.24,14.435 U1.20
TIM1_SYNC: J7.1 U1.15 U1.19 | length 8.1
  Top Layer w0.152: U1.19 13.8,16.4 J7.1 ; U1.15 v1(15.8,15)
  Bottom Layer w0.152: J7.1 15.8,17.6 v1(15.8,15)
TIM2_SYNC: J7.2 U1.22 U1.23 | length 9.8
  Top Layer w0.152: U1.22 12.4,13.525 U1.23 ; U1.23 v1(14.183,13.5)
  Bottom Layer w0.152: v1(14.183,13.5) 14.183,19.323 J7.2
TX_MA: J1.4 U4.3 | length 5.1
  Top Layer w0.152: J1.4 1.66,10.36 2.8,11.5 U4.3
TX_SM: U1.26 U4.7 | length 3.5
  Top Layer w0.152: U4.7 U1.26
V_CM1: Cr2.1 Rc2.1 TP17.1 U1.9 U2.11 | length 17.2
  Top Layer w0.152: U1.9 17.106,11.5 17.606,12 18.05,12 18.666,11.384 18.851,11.384 19,11.235 Rc2.1 19.075,11.3 TP17.1 20.624,10.876 20.624,9.551 23.575,6.6 25.3,6.6 25.941,7.241 25.941,10.459 25.84,10.56 U2.11
V_CM2: Cr1.1 Rc1.1 TP12.1 U1.12 U2.7 | length 16.9
  Top Layer w0.152: U1.12 17.2,13 18.05,13 18.666,13.616 18.851,13.616 19,13.765 Rc1.1 19.075,13.7 TP12.1 20.624,14.124 20.624,15.545 23.405,18.326 25.265,18.326 25.941,17.65 25.941,14.541 25.84,14.44 U2.7
V_iso: R4.1 R5.2 U1.1 | length 5.2
  Top Layer w0.152: R5.2@9.492,7.322 10.451,7.322 10.574,7.446 10.574,7.496 12.8,9.722 U1.1
V_out1: Cf3.1 R7.1 Rb3.2 U1.8 | length 4.1
  Top Layer w0.152: U1.8 17.021,10.179 Cf3.1 Rb3.2@19,10.179 ; Rb3.2 R7.1
V_out2: Cf2.1 R6.1 Rb2.2 U1.13 | length 4.8
  Top Layer w0.152: U1.13 16.679,13.5 16.9,13.721 16.9,14.39 17.332,14.821 Cf2.1 18.004,14.825 Rb2.2 19.004,14.821 19.996,14.821 R6.1
V_REF: Cref.1 Rc1.2 Rc2.2 U1.6 U1.11 | length 7.5
  Top Layer w0.152: U1.6 15.256,10.669 15.3,10.712 15.3,12.086 15.714,12.5 U1.11 16.689,12.5 16.691,12.502 18.291,12.502 18.293,12.5 19,12.5 ; Rc2.2 19,12.5 ; Rc1.2 19,12.5 ; Cref.1 20.1,12.5 19.975,12.5 19,12.5
V_sm: Cf1.1 R3.1 Rb1.2 U1.14 | length 5.6
  Top Layer w0.152: U1.14 16.222,14.023 16.316,14.023 16.335,14.041 16.335,15.157 17.817,16.64 17.84,16.64 18,16.8 Cf1.1 18.996,16.821 Rb1.2 R3.1
VCAP_SM: C8.1 C9.1 Cd3.1 Cd4.1 Csm0.1 Csm1.1 Csm2.1 J4.4 J5.1 J5.2 J5.3 J5.4 R1.2 R3.2 SB3.1 U2.2 | length 7.9
  Top Layer w0.152: R3.2 v1(20,18.1)
  Bottom Layer w0.152: v1(20,18.1) 20,22.746 20.754,23.5 J5.1
  other v1: 47.079,16.565 46.579,17.565 45.079,18.565 46.079,18.565 47.079,18.565 48.079,18.565 44.579,19.565 43.079,20.565 43.579,21.565 42.079,22.565 43.079,22.565 31.584,23.55 32.584,23.55 33.584,23.55 34.585,23.55 35.585,23.55 36.585,23.55 37.585,23.55 38.579,23.565 39.579,23.565 40.579,23.565 41.579,23.565 42.579,23.565 43.579,23.565
Vdd_MA: C6.1 Cd1.1 J1.1 U4.1 | length 10.1
  Top Layer w0.254: Cd1.1@4.5,13.026 4.776,13.026 5.303,12.5 U4.1 ; U4.1@6.15,12.502 6.15,13.521 C6.1@6.2,13.571
  Top Layer w0.381: J1.1 1.592,17.888 3.322,17.888 4.5,16.709 Cd1.1@4.5,13.026
VIN: C1.1 C2.1 SB3.2 SB4.2 U3.3 | length 4.2
  Top Layer w0.381: U3.3 14.1,3.975 14.746,4.621 C1.1 17.757,4.621 C2.1@17.779,4.6
Viso_MA: J1.5 X1.2 | length 6.9
  Top Layer w0.762: J1.5 5.036,7.82 6.225,6.631 X1.2
Viso_SM: R4.2 SB4.1 X1.4 | length 1.9
  Top Layer w0.381: R4.2@10.426,6.472 10.426,5.887 11.305,5.008 X1.4
pads on no net: J0. J0.6 ST1.1 ST2.1 ST3.1 U1.28

## Polygon pours and split planes (outlines as drawn)
OUT2_1 on GND1 "OUT2_1_L02_P148" (solid, remove dead copper, pour order 148): 34.8,21.9 34.3,21.4 34.3,18.5 30.65,14.85 24.65,14.85 23.7,13.9 23.7,13.2 23.9,13 33.75,13 37.2,16.45 37.2,21.3 36.6,21.9
OUT1_1 on GND1 "OUT1_1_L02_P197" (solid, remove dead copper, pour order 197): 34.8,3.1 34.3,3.6 34.3,6.5 30.65,10.15 24.65,10.15 23.7,11.1 23.7,11.8 23.9,12 33.75,12 37.2,8.55 37.2,3.7 36.6,3.1
GND_SM on GND1 "GND1-GND_SM" (solid, remove dead copper, pour order 208): 8.1,0 8.1,25 39.3,25 39.3,0
GND_SM on GND1 "Top Layer-VCAP_SM" (solid, remove dead copper, pour order 198): 33.778,2.5 34.178,2.1 38.11,2.1 38.91,2.9 41.2,2.9 42.2,3.9 42.2,5.2 46.7,9.7 50,9.7 50,0 21,0 21,2.5
OUT1_2 on GND1 "NONET_L-01_P-001" (solid, remove dead copper, pour order 200): 41.1,3.1 42,4 42,5.3 46.7,10 50,10 50,12.3 39.5,12.3 39.5,3.1
OUT2_2 on GND1 "NONET_L-01_P-001" (solid, remove dead copper, pour order 206): 41.1,21.9 42,21 42,19.7 46.7,15 50,15 50,12.7 39.5,12.7 39.5,21.9
VCAP_SM on GND1 "Top Layer-VCAP_SM" (solid, remove dead copper, pour order 202): 32.9,22.5 33.3,22.9 38.9,22.9 39.7,22.1 41.2,22.1 42.2,21.1 42.2,19.8 46.7,15.3 50,15.3 50,25 20,25 20,22.5
GND_MA on GND1 "L2_GND_MA" (solid, remove dead copper, pour order 207): 0,2 0,27.5 6.9,27.5 6.9,2
OUT2_1 on GND2 "OUT2_1_L03_P101" (solid, remove dead copper, pour order 101): 34.8,21.9 34.3,21.4 34.3,18.5 30.65,14.85 24.65,14.85 23.7,13.9 23.7,13.2 23.9,13 33.75,13 37.2,16.45 37.2,21.3 36.6,21.9
OUT1_1 on GND2 "OUT1_1_L03_P164" (solid, remove dead copper, pour order 164): 34.8,3.1 34.3,3.6 34.3,6.5 30.65,10.15 24.65,10.15 23.7,11.1 23.7,11.8 23.9,12 33.75,12 37.2,8.55 37.2,3.7 36.6,3.1
GND_SM on GND2 "Top Layer-VCAP_SM" (solid, remove dead copper, pour order 213): 33.778,2.5 34.178,2.1 38.376,2.1 39.176,2.9 41.2,2.9 42.2,3.9 42.2,5.2 46.7,9.7 50,9.7 50,0 21,0 21,2.5
OUT1_2 on GND2 "NONET_L-01_P-001" (solid, remove dead copper, pour order 214): 41.1,3.1 42,4 42,5.3 46.7,10 50,10 50,12.3 39.5,12.3 39.5,3.1
VCAP_SM on GND2 "Top Layer-VCAP_SM" (solid, remove dead copper, pour order 181): 32.8,22.5 33.2,22.9 38.9,22.9 39.7,22.1 41.2,22.1 42.2,21.1 42.2,19.8 46.7,15.3 50,15.3 50,25 20,25 20,22.5
OUT2_2 on GND2 "NONET_L-01_P-001" (solid, remove dead copper, pour order 212): 41.1,21.9 42,21 42,19.7 46.7,15 50,15 50,12.7 39.5,12.7 39.5,21.9
GND_SM on GND2 "GND1-GND_SM" (solid, remove dead copper, pour order 236): 8.1,0 8.1,25 39.3,25 39.3,0
GND_MA on GND2 "L3_GND_MA" (solid, remove dead copper, pour order 235): 0,2 0,27.5 6.9,27.5 6.9,2
Viso_SM on Top Layer "NONET_L-01_P-001" (solid, remove dead copper, pour order 146): 10.849,6 10,5.151 10,0.357 12.3,0.357 12.3,5.361 11.661,6
VIN on Top Layer "Top Layer-VIN" (solid, remove dead copper, pour order 132): 17.7,0.357 17.7,2.853 16.065,2.853 15.72,3.197 15.72,4.918 14.1,4.916 12.48,4.918 12.48,3.197 12.135,2.853 10.5,2.853 10.5,0.357
Cf1 on Top Layer "NONET_L-01_P-001" (solid, remove dead copper, pour order 156): 38.3,8.75 39.5,8.75 41.25,10.5 41.25,11 39.85,12.4 38.3,12.4
Cf2 on Top Layer "NONET_L-01_P-001" (solid, remove dead copper, pour order 160): 38.3,16.25 39.5,16.25 41.25,14.5 41.25,14 39.85,12.6 38.3,12.6
GND_SM on Top Layer "Top Layer-GND_SM" (solid, remove dead copper, pour order 243): 20.6,9 22.7,6.9 25.6,6.9 25.6,10.3 25.6,10.396 24.149,10.396 23.6,10.945 23.6,11.776 24.152,12.329 26.34,12.329 26.34,12.671 24.152,12.671 23.6,13.224 23.6,14.055 24.149,14.604 25.6,14.604 25.6,14.7 25.6,18.1 22.7,18.1 20.6,16
OUT1_1 on Top Layer "Top Layer-OUT1_1" (solid, remove dead copper, pour order 241): 28.965,12.125 29.4,11.69 29.4,11 29,10.6 27.89,10.6 27.79,10.7 27.79,11.6 27.615,11.775 25.565,11.775 25.39,11.6 25.39,10.7 25.29,10.6 24.18,10.6 23.78,11 23.78,11.69 24.215,12.125
OUT2_1 on Top Layer "Top Layer-OUT2_1" (solid, remove dead copper, pour order 240): 28.965,12.875 29.4,13.31 29.4,14 29,14.4 27.89,14.4 27.79,14.3 27.79,13.4 27.615,13.225 25.565,13.225 25.39,13.4 25.39,14.3 25.29,14.4 24.18,14.4 23.78,14 23.78,13.31 24.215,12.875
GND_SM on Top Layer "Top Layer-GND_SM 1" (solid, remove dead copper, pour order 238): 34.3,2.75 39.25,2.75 39.25,22 34.3,22
OUT1_1 on Top Layer "OUT1_1_L01_P165" (solid, remove dead copper, pour order 165): 34.8,3.1 34.3,3.6 34.3,11.45 37.2,8.55 37.2,3.7 36.6,3.1
OUT2_1 on Top Layer "OUT2_1_L01_P211" (solid, remove dead copper, pour order 211): 34.8,21.9 34.3,21.4 34.3,13.55 37.2,16.45 37.2,21.3 36.6,21.9
VCAP_SM on Top Layer "Top Layer-VCAP_SM" (solid, remove dead copper, pour order 219): 21,22.1 41.2,22.1 42.2,21.1 42.2,19.8 46.7,15.3 50,15.3 50,25 21,25
OUT2_2 on Top Layer "NONET_L-01_P-001" (solid, remove dead copper, pour order 225): 41.1,21.9 42,21 42,19.7 46.7,15 50,15 50,12.7 39.5,12.7 39.5,21.9
GND_SM on Top Layer "Top Layer-VCAP_SM" (solid, remove dead copper, pour order 228): 19.636,0 50,0 50,9.7 46.7,9.7 42.2,5.2 42.2,3.9 41.2,2.9 19.636,2.9
OUT1_2 on Top Layer "NONET_L-01_P-001" (solid, remove dead copper, pour order 229): 41.1,3.1 42,4 42,5.3 46.7,10 50,10 50,12.3 39.5,12.3 39.5,3.1
+3.3V_SM on Top Layer "+3.3V_SM_L01_P231" (solid, remove dead copper, pour order 231): 10.947,7.547 10.947,5.123 13.95,5.123 13.95,10.919 13.625,10.919 13.625,10.225
GND_SM on Top Layer "GND_SM_L01_P237" (solid, remove dead copper, pour order 237): 14.598,10.702 19.3,6 19.3,5.1 14.15,5.1 14.15,10.925 14.598,10.925
VCAP_SM on Top Layer "Top Layer-VCAP_SM 1" (solid, remove dead copper, pour order 239): 16.335,0 35.226,0 35.226,25 19.7,25 19.7,20.6 25.68,20.6 27.46,18.821 27.46,14.74 27.596,14.604 29.096,14.604 29.6,14.1 29.6,13.244 29.031,12.675 26.84,12.675 26.84,12.325 29.031,12.325 29.6,11.756 29.6,10.912 29.084,10.396 27.596,10.396 27.46,10.26 27.46,6.245 25.215,4 16.335,4
OUT2_1 on Bottom Layer "OUT2_1_L04_P215" (solid, remove dead copper, pour order 215): 34.8,21.9 34.3,21.4 34.3,18.5 30.65,14.85 24.65,14.85 23.7,13.9 23.7,13.2 23.9,13 33.75,13 37.2,16.45 37.2,21.3 36.6,21.9
OUT1_1 on Bottom Layer "OUT1_1_L04_P201" (solid, remove dead copper, pour order 201): 34.8,3.1 34.3,3.6 34.3,6.5 30.65,10.15 24.65,10.15 23.7,11.1 23.7,11.8 23.9,12 33.75,12 37.2,8.55 37.2,3.7 36.6,3.1
GND_SM on Bottom Layer "GND1-GND_SM" (solid, remove dead copper, pour order 234): 21,0 39.3,0 39.3,25 21,25
GND_SM on Bottom Layer "Top Layer-VCAP_SM" (solid, remove dead copper, pour order 232): 33.778,2.5 34.178,2.1 38.11,2.1 38.91,2.9 41.2,2.9 42.2,3.9 42.2,5.2 46.7,9.7 50,9.7 50,0 21,0 21,2.5
OUT1_2 on Bottom Layer "NONET_L-01_P-001" (solid, remove dead copper, pour order 233): 41.1,3.1 42,4 42,5.3 46.7,10 50,10 50,12.3 39.5,12.3 39.5,3.1
VCAP_SM on Bottom Layer "Top Layer-VCAP_SM" (solid, remove dead copper, pour order 217): 33.778,22.5 34.178,22.9 38.9,22.9 39.7,22.1 41.2,22.1 42.2,21.1 42.2,19.8 46.7,15.3 50,15.3 50,25 19.8,25 19.8,22.5
OUT2_2 on Bottom Layer "NONET_L-01_P-001" (solid, remove dead copper, pour order 218): 41.1,21.9 42,21 42,19.7 46.7,15 50,15 50,12.7 39.5,12.7 39.5,21.9

## Other copper
Top Layer:
  text "1" at 2.731,0.492 h1.02
GND1:
  text "2" at 3.561,0.492 h1.02
GND2:
  text "3" at 4.661,0.492 h1.02
Bottom Layer:
  text "4" at 5.661,0.492 h1.02
Multi-Layer:
  pour cut-out: 6.9,3.327 6.9,25 8.1,25 8.1,3.327 7.95,3.177 7.95,2.177 8.1,2.027 8.1,0 6.9,0 6.9,2.027 7.05,2.177 7.05,3.177

## Silkscreen, mask and mechanical layers (free items; w line width, h text height)
Top Overlay:
  drawing of 118 lines, arcs and shapes, not listed
  text "STAT" at 17.988,23.8 h1
  text "COM" at 17.988,22.391 h1
  text "https://github.com/ / mmcmerlin/Micro-MMC" at 32.532,22.2 h1.1
  text "sync2" at 16.249,21.754 h1 r270
  text "SM+ / VCAP" at 20.941,20.574 h1.52
  text "Lf" at 37.144,20.5 h1
  text "EN2" at 23.544,19.5 h1
  text "sync1" at 16.249,19.17 h1 r270
  text "PWM2" at 21.588,18.5 h1
  text "reset" at 9.388,18.249 h1 r90
  text "DC: 4-14V, 0-5A" at 42.11,18.023 h1.5 r270
  text "VDD" at 2.957,17.898 h1
  text "Csm" at 25.544,16.9 h1
  text "3V3" at 2.957,16.698 h1
  text "Cf" at 37.144,16.7 h1
  text "Cf Solder Bridge" at 35.553,15.921 h1 r270
  text "VCAP" at 43.7,15.427 h1.52
  text "ISOLATION" at 8,15 h1.2 r90
  text "Csm" at 31.726,13.556 h1 r270
  text "CM2" at 20.555,13.295 h1
  text "TX" at 7.9,12.888 h1 r90
  text "OUT2" at 43.7,12.887 h1.52
  text "CM1" at 20.555,10.895 h1
  text "OUT1" at 43.7,10.347 h1.52
  text "PTP" at 9.826,7.95 h1
  text "GND" at 43.7,7.807 h1.52
  text "Viso" at 2.857,7.698 h1
  text "Cf" at 37.144,7.5 h1
  text "nFLT" at 21.088,7.3 h1
  text "Csm" at 25.544,7.3 h1
  text "RX" at 7.9,7.288 h1 r90
  text "3V3" at 12.563,6.7 h1
  text "5V0" at 2.857,6.498 h1
  text "PWM1" at 21.588,5.7 h1
  text "X" at 29.368,5.139 h7
  text "EN1" at 23.577,4.614 h1
  text "Lf" at 37.144,3.7 h1
  text "SM- / GND" at 21.027,2.712 h1.52
  text "layers" at 2.8,1.8 h1
  text "Power Select" at 12.8,1.3 h1
  text "Viso / ext" at 7.95,0.1 h1
  text "bridge" at 12.5,0.1 h1
  text "Vsm / cap" at 18.55,0.1 h1
Bottom Overlay:
  drawing of 55 lines, arcs and shapes, not listed
  text "SM+ / VCAP" at 31.341,20.574 h1.52
  text "sync2" at 16.599,19.356 h1 r270
  text "VDD" at 5.243,17.898 h1
  text "ISOLATION" at 8,17.5 h1.2 r90
  text "sync1" at 16.599,16.77 h1 r270
  text "Timers" at 17.545,16.77 h1 r270
  text "3V3" at 5.243,16.698 h1
  text "VCAP" at 47.079,15.427 h1.52
  text "TX" at 5.143,14.686 h1
  text "ver3.40" at 15.5,14.1 h1.5
  text "06/2025" at 22,14.1 h1.5
  text "OUT2" at 47.079,12.887 h1.52
  text "GND" at 5.143,12.198 h1
  text "OUT1" at 47.079,10.347 h1.52
  text "Micro-MMC Sub-Module" at 22,10.1 h2
  text "RX" at 5.143,9.586 h1
  text "MMC Merlin" at 22,8.564 h1.5
  text "GND" at 47.079,7.807 h1.52
  text "Viso" at 5.143,7.698 h1
  text "5V0" at 5.143,6.498 h1
  text "SM- / GND" at 31.427,2.712 h1.52
  text "O" at 20.512,-1.707 h13
Top Solder:
  rectangle: 2.465,0.2 6.6,1.8
Bottom Solder:
  rectangle: 2.465,0.2 6.6,1.8
Board:
  the board outline again, w0.254
Dimensions:
  region: 21,0 21,2.8 31.5,2.8 31.5,22.25 21,22.25 21,25 5.7,25 5.7,6.5 13.7,6.5 13.7,0
  lines w0.254: 5.7,0 31.7,0 31.7,25 5.7,25 5.7,0
  lines w0.3: 24.92,1.5 24.92,23.5 ; 27.46,1.5 27.46,23.5 ; 22.38,1.5 30,1.5 30,23.5 22.38,23.5 22.38,1.5

## Text inside footprints (layer, text, board x,y; h text height)
Csm1: Bottom Overlay "+" at 29.4,8.5 h1.5 r180
Csm2: Bottom Overlay "+" at 29.39,18.118 h1.5 r180
U2: Top Assembly "*" at 28.203,11.586 h1.27 r180